# Altium PCB PCB.PcbDoc (part 2 of 3)
Units mm, origin at the board's own origin, x right, y up, seen from the top; angles counter-clockwise.
Board outline 35.13 x 75.01 mm, 4 copper layers (Top Layer, GND_Signal_1, Signal_1, Bottom Layer), stack 1.707 mm thick; 130 components, 99 nets, 648 pads, 871 vias.
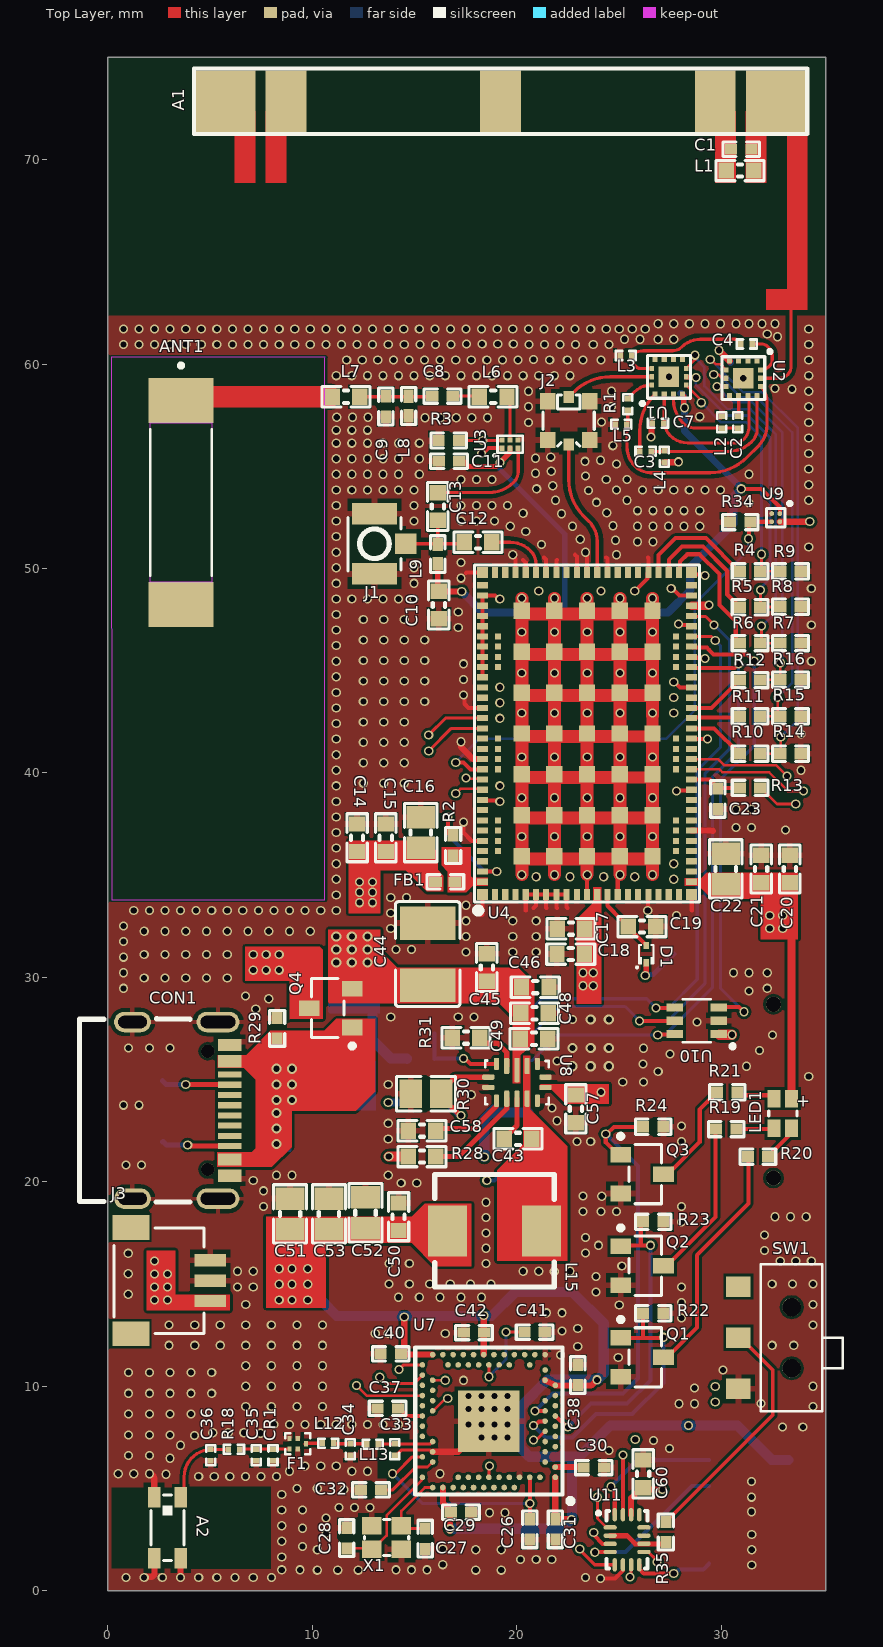
[diagram p0: Top Layer view]

## Part data (continued)
U9: "1.0 A Load Switch IC with Slew Rate Control Driver in Ultra Small Package", LCSC=C146305, Manufacturer=Toshiba, Manufacturer Part Number=TCK106AG,LF, Part number IPS=00000004390, Supplier Part Number 1=TCK106AGLFTR-ND, Artikkelnr Noca=N.A., Component Class=Misc_ICs, ComponentLink1Description=Datasheet, ComponentLink1URL=https://toshiba.semicon-storage.com/info/docget.jsp?did=30131&prodName=TCK106AG, ComponentLink2Description="Supplier link", ComponentLink2URL=N.A., Footprint Doc=WLCSP-4, HelpURL=N.A., LatestRevisionDate=2019-03-01, Note=N.A., Pad Count=4, PartId=101900575, Part Number=TCK106AG, Published=2019-02-17, Supplier 1=Digi-Key, Supplier 2=Mouser, Supplier Part Number 2=757-TCK106AGLF
U10: "TVS DIODE 5VWM 12.5VC SC70-6", Capacitance=130pF, Case/Package=SC, Clamping Voltage=12.5V, LCSC=C85191, Leakage Current=5uA, Manufacturer=Semtech, Max Breakdown Voltage=6V, Max Operating Temperature=125°C, Min Operating Temperature=-55°C, Operating Supply Voltage=5V, Peak Pulse Current=8A, Peak Pulse Power=100W, Power Line Protection=No, Resistor Type=Zener, Supplier Part Number 1=SMF05CCT-ND, Test Current=1mA, Category="TVS Diodes", Clamping Voltage-Max=12.5V, ComponentLink1Description=https://datasheet.ciiva.com/338/smf05c-338385.pdf?src-supplier=Digi-Key, ComponentLink1URL=https://datasheet.ciiva.com/338/smf05c-338385.pdf?src-supplier=Digi-Key, ComponentLink2Description=https://datasheet.ciiva.com/18065/getdatasheetpartid-89007-18065142.pdf?src-supplier=Verical, ComponentLink2URL=https://datasheet.ciiva.com/18065/getdatasheetpartid-89007-18065142.pdf?src-supplier=Verical, ComponentLink3Description=https://datasheet.ciiva.com/338/smf05c-338386.pdf?src-supplier=Digi-Key, ComponentLink3URL=https://datasheet.ciiva.com/338/smf05c-338386.pdf?src-supplier=Digi-Key, ComponentLink4Description=https://datasheet.ciiva.com/338/smf05c-338387.pdf?src-supplier=Digi-Key, ComponentLink4URL=https://datasheet.ciiva.com/338/smf05c-338387.pdf?src-supplier=Digi-Key, ComponentLink5Description=https://datasheet.ciiva.com/16387/smf05c-16387308.pdf?src-supplier=Future+Electronics, ComponentLink5URL=https://datasheet.ciiva.com/16387/smf05c-16387308.pdf?src-supplier=Future+Electronics, Depth=1.25mm, Diode Type=ZENER, Direction=Unidirectional, Element Configuration="Common Anode", ESD Protection=Yes, Height=0.9mm, Lead Free="Lead Free", Length=2mm, Manufacturer Part Number=SMF05C.TCT, Max Reverse Leakage Current=5uA, Min Breakdown Voltage=6V, Mount="Surface Mount", Number of Channels=5, Number of Elements=5, Number of Pins=6, Number of Unidirectional Channels=5, Packaging="Tape and Reel", Polarity=Unidirectional, Pricing 1="1=0.79000, 10=0.69300, 100=0.53130, 500=0.42000, 1000=0.33600 (USD)", Radiation Hardening=No, Reverse Breakdown Voltage=6V, Reverse Standoff Voltage=5V, RoHS=Yes, RoHS Compliant=Yes, Series=SMF, Stock 1=164885, Supplier 1=Digi-Key, Voltage Rating (DC)=5V, Width=1.25mm, Working Voltage=5V
U11: "Data / Audio Low-Voltage Dual DPDT Analog Switch", LCSC=C457657, Manufacturer="ON Semiconductor", Part number IPS=00000009986, Supplier Part Number 1=FSA2466UMXCT-ND, Artikkelnr Noca=15070069, Component Class=Misc_ICs, ComponentLink1Description=Datasheet, ComponentLink1URL=N.A., ComponentLink2Description="Supplier link", ComponentLink2URL=N.A., Footprint Doc=UFQFN-16, HelpURL=https://www.onsemi.com/pub/Collateral/FSA2466-D.PDF, LatestRevisionDate=2019-05-15, Manufacturer Part Number=FSA2466UMX, Note=N.A., Pad Count=16, PartId=101900422, Part Number=FSA2466UMX, Published=2016-05-18, Supplier 1=Digi-Key, Supplier 2=Mouser, Supplier Part Number 2=512-FSA2466UMX
X1: library part XTAL_SMD2016_32MHz_8pF_Murata, "XTAL SMD 2016, 32MHz, Cl=8pF, Tol: ±10ppm, Stab: ±10ppm", LCSC=C2965582, Package=SMD-2016, ComponentLink1Description=Datasheet, ComponentLink1URL=N.A., ComponentLink2Description="Supplier link", ComponentLink2URL=N.A.

## Via types
v1: diameter 0.45, hole 0.3, Top Layer to Bottom Layer, tented both sides, 821 vias
v2: diameter 0.5, hole 0.3, Top Layer to Bottom Layer, tented both sides, 26 vias
v3: diameter 0.45, hole 0.3, Top Layer to Bottom Layer, 24 vias

## Nets (pads, with @x,y where several pads share a name; then routed paths per layer and width w, separated by ;. In a path a pad name is that pad's centre, name@x,y a point inside that pad or via, vN(x,y) a via of type N, cw(c..) or ccw(c..) an arc to the next point about the centre after c; other vN are vias at no path point)
1_BUZZER: U4.4
+3V3: C14.1 C15.1 C16.1 C17.1 C18.1 C20.1 C21.1 C22.1 C29.1 C31.1 C38.1 C40.1 C42.1 C50.2 C51.2 C52.2 C53.2 C60.1 FB1.1 L15.2 LED1.4 P1.1 R27.2 U4.12 U4.22 U7.A22 U7.AD14 U7.AD23 U7.B1 U7.W1 U7.Y2 U9.A2 U11.14 | length 151.2
  Top Layer w0.3: v1(14.503,13.386) 14.503,11.743 C40.1@14.343,11.582 14.382,11.543 U7.AD23@15.891,11.543 ; U7.A22@16.391,5.043 16.391,4.293 16.739,3.945 v1(16.739,3.023) v1@16.739,2.921 ; v1(18.39,13.462) v1(18.39,13.462) U7.AD14@18.391,11.543 ; U7.Y2@21.391,10.293 21.891,10.043 22.987,10.037 23.645,10.033 v1(23.927,10.312) ; U7.B1@21.891,5.543 21.891,3.501 C31.1@21.895,3.497 22.639,3.497 v1@22.682,3.454 ; U11.14@25.6,3.714 25.6,4.518 26.035,4.953 v1(27.127,4.953) ; U9.A2@32.874,52.292 34.334,52.292 v1(34.341,52.299)
  Top Layer w0.4: 33.274,32.639 33.445,32.468 LED1.4@33.445,24.068
  GND_Signal_1 w0.3: v1@16.739,2.921 v1(16.739,3.023) ; v1@22.682,3.454 v1(22.682,3.48) ; v1(27.127,4.953) 28.408,6.234 v1(28.408,8.077)
  GND_Signal_1 w0.4: 12.319,23.851 12.344,23.876 v1(13.716,23.876)
  GND_Signal_1 w0.5: 29.591,31.75 29.591,39.481 33.655,43.545 33.655,51.613 v1(34.341,52.299)
  GND_Signal_1 w1.5: 10.5,15.24 12.319,17.059 12.319,23.851 12.319,28.616 13.473,29.77 16.129,29.77 ; 12.573,33.528 12.573,35.201 13.452,36.08 14.72,36.08 16.129,34.671 16.129,29.77 ; 32.766,32.893 32.766,32.004 32.512,31.75 29.591,31.75 25.908,31.75 23.928,29.77 16.129,29.77
  Bottom Layer w0.4: v1(13.716,23.876) 14.394,23.876 14.744,24.226 R27.2@14.744,24.308
  Bottom Layer w0.5: 10.287,14.224 10.414,14.224 11.201,13.437 18.771,13.437 19.939,14.605 22.733,14.605 24.257,13.081 24.257,10.618 v1@23.964,10.326 ; v1(16.739,3.023) 22.225,3.023 v1(22.682,3.48) 22.707,3.455 22.707,6.553 ; v1@23.94,10.326 21.515,10.326 20.193,9.003 20.193,6.985 20.625,6.553 22.707,6.553 ; P1.1@33.306,6.395 32.481,6.395 30.799,8.077 v1(28.408,8.077) 24.587,8.077 23.063,6.553 22.707,6.553
  other v1: 23.241,29.591 23.749,29.591 23.241,30.226 23.749,30.226 32.385,32.385 33.02,32.385 32.385,33.02 33.02,33.02 12.319,33.655 12.954,33.655 12.319,34.163 12.954,34.163 12.319,34.671 12.954,34.671
  other v3: 8.382,14.224 9.017,14.224 9.779,14.224 8.382,14.986 9.017,14.986 9.779,14.986 8.382,15.748 9.017,15.748 9.779,15.748
+BATT: J3.3 Q4.3 | length 21.2
  GND_Signal_1 w1.5: 2.667,15.875 4.064,17.272 8.256,17.272 10.287,19.303 10.287,28.575 8.255,30.607
  other v1: 2.286,14.224 2.921,14.224 2.286,14.859 2.921,14.859 2.286,15.494 2.921,15.494 2.286,16.129 7.112,30.353 7.747,30.353 8.382,30.353 7.112,31.115 7.747,31.115 8.382,31.115
ANT_GPS: C8.2 C9.1 L7.2 L8.2 | length 3.6
  Top Layer w0.156: L7.2@12.325,58.408 15.809,58.408 ccw(c15.809,58.495) C8.2@15.87,58.434
ANT_LTE: A1.1 C1.1 L1.1 U2.13 | length 6
  Top Layer w0.156: U2.13@31.932,59.311 32.844,59.311 ccw(c32.844,59.893) 33.426,59.893 33.426,64.11
BLE_ANT: A2.1 C36.2 R18.2 | length 4.4
  Top Layer w0.156: A2.1@3.478,4.796 ccw(c3.789,4.796) A2.1@3.569,4.576 ccw(c3.569,4.65) A2.1@3.643,4.65 ; A2.1@3.734,4.456 3.734,5.563 cw(c5.08,5.563) 5.08,6.909 R18.2@5.887,6.909
BLE_RF: C34.2 L12.1 L13.2 | length 1.6
  Top Layer w0.156: L12.1@11.055,7.214 11.08,7.188 11.963,7.188 12.644,7.188 L13.2@12.669,7.163
BOOT: C43.1 U8.10 | length 2.1
  Top Layer w0.254: C43.1@19.416,22.327 19.595,22.327 20.015,22.747 U8.10@20.015,24.067
COEX0: R3.2 U3.6 U4.93 U7.P23 | length 65.8
  Top Layer w0.125: U7.P23@15.891,8.793 15.906,8.778 16.526,9.398 v1(16.63,9.398) ; v1(17.018,38.989) 17.253,39.224 18.28,39.224 U4.93@18.324,39.18 ; R3.2@17.179,56.265 v1(18.338,56.265) 19.222,56.265 ccw(c19.222,56.341) U3.6@19.276,56.287
  Signal_1 w0.125: v1(16.63,9.398) 12.065,9.398 11.684,9.779 11.684,24.124 18.054,30.494 18.054,37.953 v1(17.018,38.989) 16.51,39.497 16.51,45.246 18.889,47.625 21.971,47.625 22.574,48.228 22.574,51.467 19.787,54.254 19.787,55.213 18.734,56.265 v1(18.338,56.265)
  Bottom Layer w0.125: v1(18.338,56.265) v1@18.381,56.223
COEX1: U4.92 U7.U24 | length 37
  Top Layer w0.125: v1(12.167,10.033) 12.657,9.543 U7.U24@15.391,9.543 ; v1(17.526,39.751) 17.562,39.715 18.289,39.715 U4.92@18.324,39.68
  Signal_1 w0.125: v1(12.167,10.033) 12.167,24.26 18.324,30.417 18.324,39.003 17.685,39.642 17.544,39.642 v1@17.653,39.751
COEX2: R34.2 U4.91 U7.Y23 U9.B2 | length 64.5
  Top Layer w0.125: U7.Y23@15.894,10.29 v1@16.507,10.29
  Top Layer w0.2: U7.Y23@15.891,10.293 U7.Y23@15.894,10.29 ; v1@16.507,10.29 v1(16.51,10.287) ; v1(17.018,40.513) 17.4,40.513 17.745,40.169 18.313,40.169 U4.91@18.324,40.18 ; v1(31.344,51.46) 31.344,51.528 31.369,51.553 31.369,52.205 R34.2@31.437,52.273 31.452,52.288 32.471,52.288 U9.B2@32.474,52.292
  Signal_1 w0.125: v1(16.51,10.287) 16.002,9.779 13.081,9.779 12.446,10.414 12.446,24.193 18.594,30.341 18.594,39.76 17.841,40.513 v1(17.018,40.513)
  Bottom Layer w0.125: v1(17.018,40.513) 18.184,41.679 27.328,41.679 28.716,43.067 28.716,48.274 29.337,48.895 31.344,50.902 v1(31.344,51.46)
DEC0: C19.1 D1.2 U4.13 | length 3.4
  Top Layer w0.2: U4.13@24.444,34.06 24.444,33.504 25.162,32.787 25.187,32.787 25.462,32.512 C19.1@25.462,32.487 25.462,32.355 25.452,32.345 25.578,32.345 26.283,31.64 26.315,31.64 26.34,31.615 D1.2@26.34,31.56
DEC1: C30.1 U7.C1 | length 1.4
  Top Layer w0.3: U7.C1@21.891,6.043 23.225,6.043 C30.1@23.249,6.02
DEC3: C32.1 U7.D23 | length 3.1
  Top Layer w0.15: C32.1@13.378,4.928 13.945,4.928 15.062,6.045 15.642,6.045 U7.D23@15.891,6.293
DEC4_6: C26.1 U7.B5 U7.E24 | length 11.2
  Top Layer w0.15: v1(13.932,5.715) 14.072,5.715 14.9,6.543 U7.E24@15.391,6.543
  Top Layer w0.2: U7.B5@20.641,5.543 20.645,5.539 v1(20.645,4.269) 20.645,3.502 C26.1@20.65,3.497
  Bottom Layer w0.15: v1(13.932,5.715) 15.378,4.269 v1(20.645,4.269)
DETECT: J5.CD U4.45 U10.3 | length 42.4
  Top Layer w0.2: U4.45@28.564,46.18 28.614,46.13 29.308,46.13 29.395,46.043 29.396,46.043 29.64,45.799 31.29,45.799 v1(31.623,45.466) ; U10.3@29.887,28.529 29.91,28.552 30.884,28.552 v1(31.12,28.316)
  Signal_1 w0.2: v1(18.542,20.066) 24.384,20.066 31.12,26.802 v1(31.12,28.316)
  Bottom Layer w0.152: v1(31.12,28.316) 29.972,29.464 29.972,39.684 31.623,41.335 v1(31.623,45.466)
  Bottom Layer w0.2: v1(18.542,20.066) 18.923,20.066 20.029,21.172 J5.CD@20.57,21.172
EN: R25.1 R26.2 U8.5 | length 4.4
  Top Layer w0.2: v1(17.399,26.035) 17.467,26.035 17.735,25.767 U8.5@19.015,25.767
  Bottom Layer w0.2: R26.2@15.991,27.254 R25.1@15.991,26.01 16.017,26.035 v1(17.399,26.035)
ENABLE: R2.1 U4.101 | length 5.6
  Top Layer w0.2: v1(16.637,37.846) 16.637,37.076 R2.1@16.739,36.974 ; U4.101@18.324,35.18 v1(19.025,35.179)
  Bottom Layer w0.2: v1(16.637,37.846) 16.637,36.965 18.423,35.179 v1(19.025,35.179)
FB: R27.1 R30.2 U8.6 | length 5.8
  Top Layer w0.254: v1(17.272,23.241) 17.237,23.241 16.32,24.158 R30.2@16.32,24.308 16.32,24.458 16.979,25.117 U8.6@18.615,25.117
  Bottom Layer w0.254: R27.1@16.244,24.308 16.244,24.158 17.123,23.279 17.234,23.279 v1(17.272,23.241)